# Altium PCB Sampler_DIOT.PCBDOC (part 10 of 11)
Units mm, origin at the board's own origin, x right, y up, seen from the top; angles counter-clockwise.
Board outline 222.9 x 100 mm, 4 copper layers (L1, P2, L3, L4), stack 1.6 mm thick; 754 components, 442 nets, 2347 pads, 1230 vias.
Unrouted connection lines stored in the file: 10.
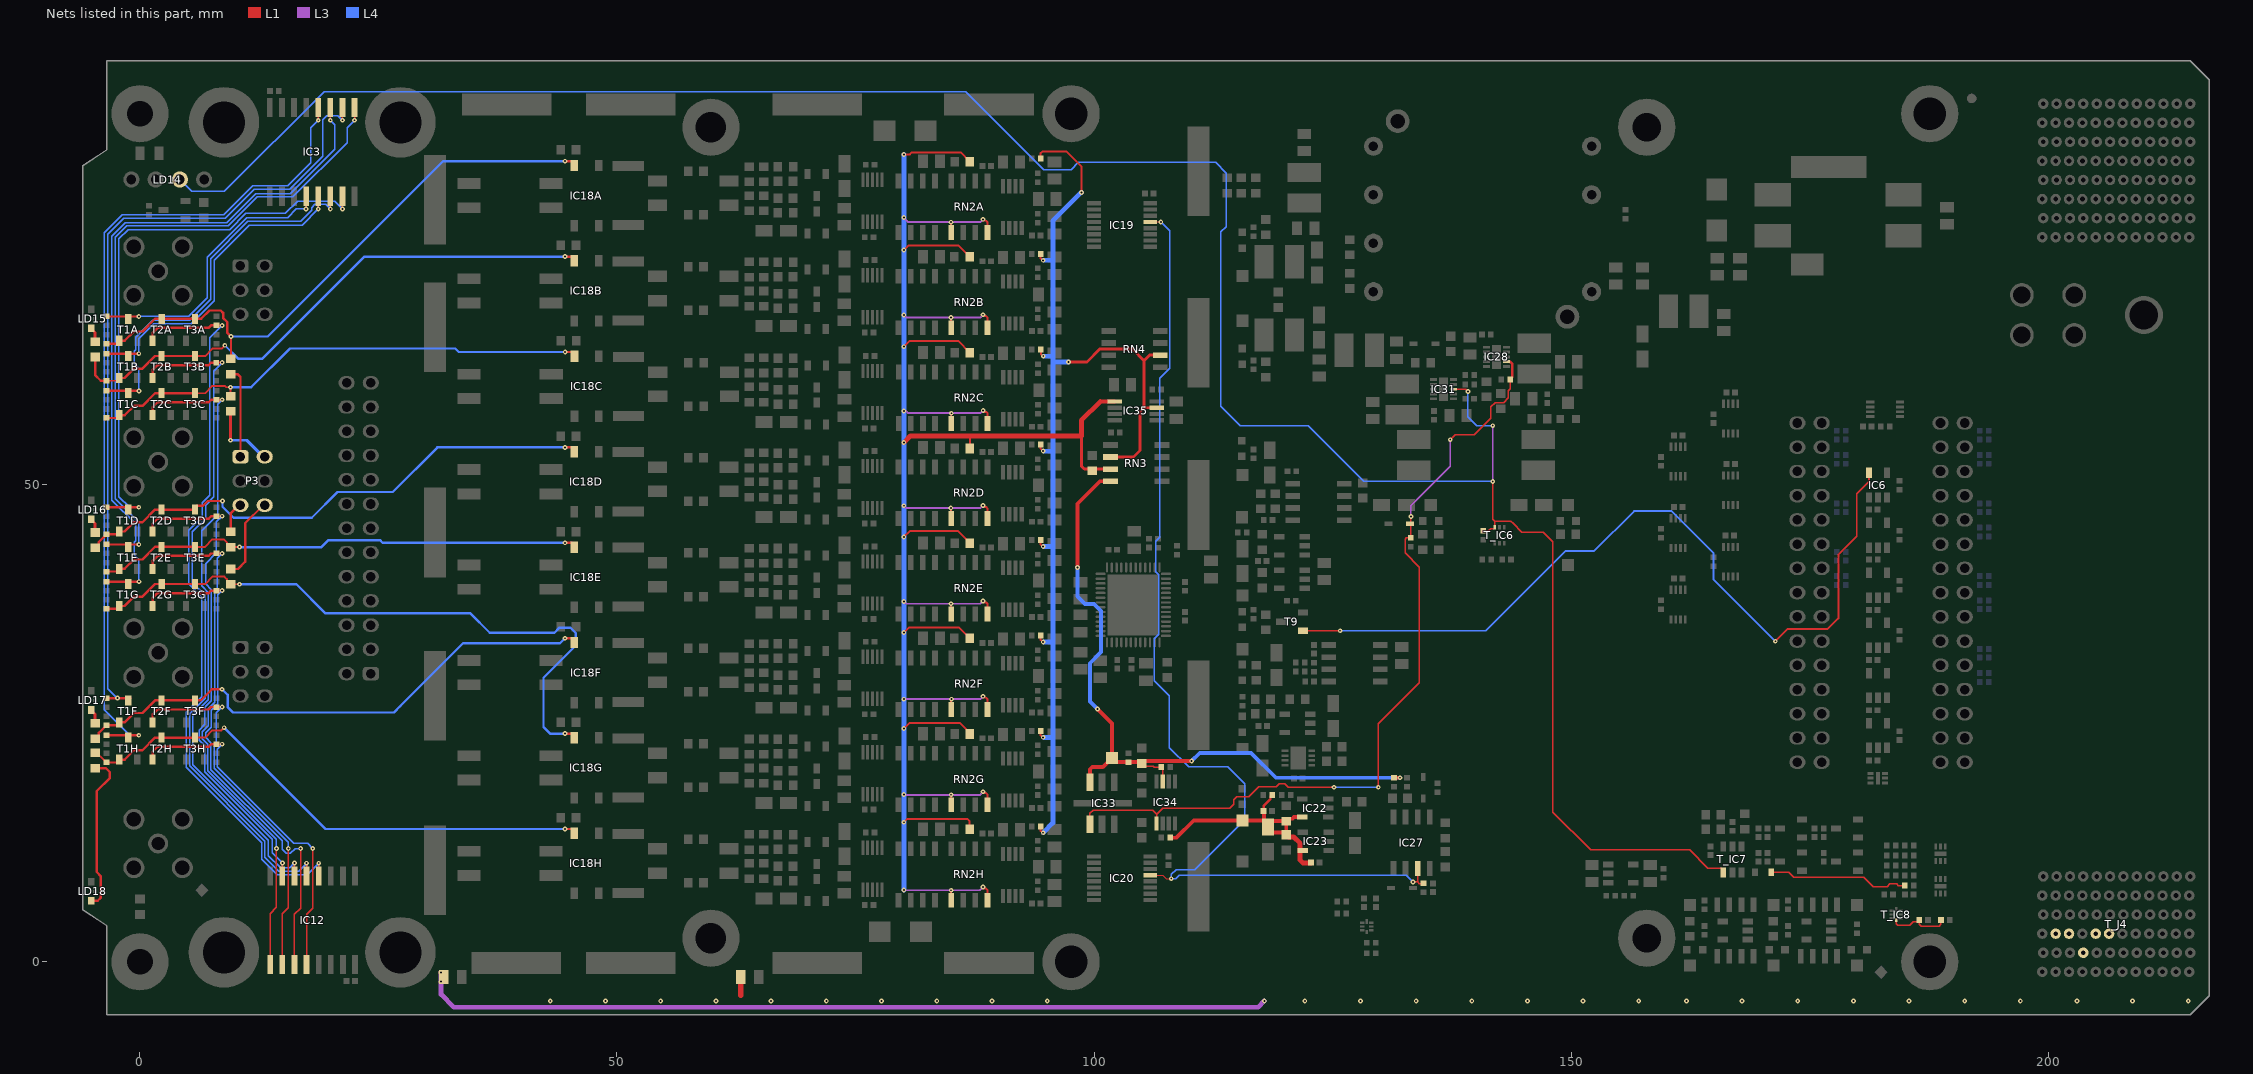
[diagram p11: the nets of this part, all layers, seen from the top]

## Via types
v1: diameter 0.5, hole 0.2, L1 to L4, tented both sides, 1208 vias
v2: diameter 1, hole 0.6, L1 to L4, tented both sides, 16 vias
v3: diameter 0.6, hole 0.3, L1 to L4, tented both sides, 6 vias

## Nets (pads, with @x,y where several pads share a name; then routed paths per layer and width w, separated by ;. In a path a pad name is that pad's centre, name@x,y a point inside that pad or via, vN(x,y) a via of type N, cw(c..) or ccw(c..) an arc to the next point about the centre after c; other vN are vias at no path point) (continued)
PSU_EN: IC31.3 LD14.3 T_IC6.3 T_IC7.1 T_R8.1 | length 250.4
  L1 w0.152: IC31.3@137.691,60.02 138.533,60.02 138.547,60.007 138.955,60.007 v1(139.192,59.77) ; T_R8.1@140.8,45.17 141.348,45.17 141.57,45.392 141.926,45.392 142,45.466 T_IC6.3@142,45.538 142,46.186 ; v1@141.8,50.269 141.8,46.386 142,46.186 ; T_IC7.1@165.969,9.386 165.969,9.574 165.745,9.798 164.346,9.798 162.42,11.723 152.077,11.723 148.1,15.7 148.1,44.025 147.108,45.017 145.375,45.017 145.282,45.017 144.858,45.017 143.925,45.95 143.689,46.186 142,46.186
  L3 w0.152: v1@141.8,50.269 v1(141.8,50.351) v1(141.8,56.2)
  L4 w0.152: LD14.3@4.18,82 5.425,80.755 8.846,80.755 19.314,91.223 86.559,91.223 94.732,83.05 97.625,83.05 98.368,83.793 112.736,83.793 113.851,82.677 113.851,77.07 113.309,76.527 113.309,58.213 115.347,56.175 122.453,56.175 128.277,50.351 v1@141.767,50.351 ; v1(139.192,59.77) 139.192,57.109 140.1,56.2 v1(141.8,56.2)
REF_P1V7066: IC35.1 R7A.1 R7B.1 R7C.1 R7D.1 R7E.1 R7F.1 R7G.1 R7H.1 R83.2 RN2A.5 RN2A.8 RN2B.5 RN2B.8 RN2C.5 RN2C.8 RN2D.5 RN2D.8 RN2E.5 RN2E.8 RN2F.5 RN2F.8 RN2G.5 RN2G.8 RN2H.5 RN2H.8 RN3.3 | length 253.2
  L1 w0.203: v1(80.069,14.631) 80.393,14.955 86.744,14.955 86.969,14.73 R7H.1@86.969,13.88 ; v1(80.069,24.455) 80.669,25.055 85.944,25.055 86.994,24.005 R7G.1@86.994,23.88 ; v1(80.069,34.505) 80.619,35.055 85.819,35.055 R7F.1@86.969,33.905 ; v1(80.069,44.53) 80.694,45.155 85.769,45.155 86.994,43.93 R7E.1@86.994,43.88 ; v1(80.069,64.48) 80.669,65.08 85.769,65.08 R7C.1@86.994,63.855 ; v1(80.069,74.605) 80.569,75.105 85.769,75.105 R7B.1@86.969,73.905 ; v1(80.069,84.63) 80.7,84.63 80.904,84.834 86.04,84.834 R7A.1@86.994,83.88 ; v1(84.994,47.555) 85.024,47.525 RN2D.5@85.024,46.455 ; v1(85.019,37.53) 85.024,37.525 RN2E.5@85.024,36.455 ; v1(85.019,67.53) 85.024,67.525 RN2B.5@85.024,66.455 ; v1(85.019,77.53) 85.024,77.525 RN2A.5@85.024,76.455 ; RN2H.5@85.024,6.455 v1(85.024,7.5) ; RN2G.5@85.024,16.455 v1(85.024,17.51) ; RN2F.5@85.024,26.455 85.024,27.485 v1(85.069,27.53) ; RN2C.5@85.037,56.412 85.037,57.498 v1(85.044,57.505) ; R7D.1@86.994,53.805 86.994,55.054 87.069,55.129 ; v1(88.369,7.83) 88.519,7.68 88.694,7.68 88.834,7.54 RN2H.8@88.834,6.455 ; v1(88.369,17.83) 88.519,17.68 88.694,17.68 88.834,17.54 RN2G.8@88.834,16.455 ; v1(88.369,27.83) 88.519,27.68 88.694,27.68 88.834,27.54 RN2F.8@88.834,26.455 ; v1(88.369,37.83) 88.519,37.68 88.694,37.68 88.834,37.54 RN2E.8@88.834,36.455 ; v1(88.369,47.83) 88.519,47.68 88.694,47.68 88.834,47.54 RN2D.8@88.834,46.455 ; v1(88.369,67.83) 88.519,67.68 88.694,67.68 88.834,67.54 RN2B.8@88.834,66.455 ; v1(88.369,77.83) 88.519,77.68 88.694,77.68 88.834,77.54 RN2A.8@88.834,76.455 ; v1(88.382,57.786) 88.532,57.636 88.707,57.636 88.847,57.496 RN2C.8@88.847,56.412
  L1 w0.3: 98.675,55.129 98.675,51.951 98.986,51.64 99.635,51.64 R83.2@99.8,51.475 99.965,51.64 RN3.3@101.725,51.64
  L1 w0.45: 100.65,58.725 IC35.1@102.175,58.725
  L1 w0.508: v1(80.069,54.43) 80.768,55.129 87.069,55.129 98.675,55.129 98.675,56.75 100.65,58.725
  L3 w0.203: v1(80.069,7.53) 80.099,7.5 v1(85.024,7.5) 88.039,7.5 v1(88.369,7.83) ; v1@80.069,17.506 v1@85.02,17.506 ; v1(80.069,37.782) 80.084,37.782 80.336,37.53 v1(85.019,37.53) 88.069,37.53 v1(88.369,37.83) ; v1(80.069,47.808) 80.084,47.808 80.336,47.555 v1(84.994,47.555) 88.094,47.555 v1(88.369,47.83) ; v1(80.069,67.809) 80.348,67.53 v1(85.019,67.53) 88.069,67.53 v1(88.369,67.83) ; v1(80.069,78.005) 80.544,77.53 v1(85.019,77.53) 88.069,77.53 v1(88.369,77.83) ; v1@80.194,27.53 v1(85.069,27.53) 88.069,27.53 v1(88.369,27.83) ; v1@80.279,57.764 80.538,57.505 v1(85.044,57.505) 88.1,57.505 v1(88.382,57.786) ; v1@85.024,17.48 88.019,17.48 v1(88.369,17.83)
  L4 w0.508: v1(80.069,7.53) v1(80.069,17.531) v1(80.069,37.782) v1(80.069,44.53) v1(80.069,54.43) v1(80.069,67.809) v1(80.069,84.63)
  other v1: 80.069,27.53 80.069,57.733
REF_P2V048: IC35.7 R13A.1 R13B.1 R13C.1 R13D.1 R13E.1 R13F.1 R13G.1 R13H.1 RN3.2 RN4.6 | length 115.3
  L1 w0.203: R13H.1@94.414,14.205 94.414,13.735 94.644,13.505 v1(94.669,13.53) ; R13G.1@94.414,24.205 94.414,23.735 94.644,23.505 v1(94.669,23.53) ; R13F.1@94.414,34.205 94.414,33.735 94.644,33.505 v1(94.669,33.53) ; R13E.1@94.414,44.205 94.414,43.735 94.644,43.505 v1(94.669,43.53) ; R13D.1@94.414,54.205 94.414,53.785 v1(94.669,53.53) ; R13B.1@94.414,74.205 94.414,73.735 94.644,73.505 v1(94.669,73.53) ; R13A.1@94.414,84.205 94.414,84.764 94.573,84.923 97.127,84.923 98.675,83.375 v1(98.675,80.65) ; R13C.1@94.427,64.161 94.427,63.691 94.657,63.461 v1(94.682,63.486)
  L1 w0.3: v1@97.285,62.877 99.252,62.877 100.603,64.228 104.032,64.228 105.255,63.005 ; RN3.2@101.725,52.91 104.134,52.91 104.835,53.611 104.835,57.667 105.255,58.087 105.255,63.005 ; 105.365,58.082 IC35.7@106.568,58.082 ; RN4.6@106.95,63.59 105.84,63.59 105.255,63.005
  L4 w0.5: v1(94.669,13.53) 95.694,14.555 95.694,23.526 ; v1@94.733,23.526 95.694,23.526 ; v1@94.733,33.526 95.694,33.526 ; v1@94.733,43.526 95.694,43.526 ; v1@94.733,53.526 95.694,53.526 ; v1@94.733,73.526 95.694,73.526 ; v1@94.746,63.482 95.694,63.482 ; v1(97.339,62.877) 95.694,62.877 ; v1(98.675,80.65) 95.694,77.669 95.694,73.526 ; 95.694,23.526 95.694,33.526 ; 95.694,33.526 95.694,43.526 ; 95.694,43.526 95.694,53.526 ; 95.694,53.526 95.694,62.877 ; 95.694,62.877 95.694,63.482 ; 95.694,63.482 95.694,73.526
REF_P4V096: C100.2 IC33.7 IC34.7 R59.2 R81.1 R82.2 RN3.4 TP15.1 | length 74.7
  L1 w0.152: C100.2@104.983,20.8 105.292,20.491 106.209,20.491 106.291,20.409 R82.2@107.051,20.409 107.194,20.266 IC34.7@107.194,18.905 IC34.7@107.232,18.943
  L1 w0.35: R59.2@131.425,19.29 v1(132.076,19.29)
  L1 w0.4: v1(98.258,41.34) 98.258,48.008 100.62,50.37 RN3.4@101.725,50.37 ; IC33.7@99.574,18.834 99.574,20.191 99.808,20.425 100.925,20.425 TP15.1@101.875,21.375 ; v1(100.376,26.488) 101.9,24.964 TP15.1@101.9,21.35 ; TP15.1@101.925,21.375 102.37,20.93 R81.1@103.6,20.93 104.853,20.93 C100.2@104.983,20.8 105.229,21.046 110.225,21.046 v1@110.235,21.056
  L4 w0.4: v1(98.258,41.34) 98.258,38.309 99.069,37.498 100.015,37.498 100.739,36.774 100.739,32.464 99.572,31.297 99.572,27.292 v1(100.376,26.488) ; v1(110.235,21.046) 111.076,21.887 116.463,21.887 119.06,19.29 v1(132.076,19.29)
REF_S\H\D\N: D10.1 IC28.7 IC33.1 IC34.1 R69.1 R157.1 | length 88.5
  L1 w0.152: IC33.1@99.574,14.434 99.574,15.549 99.92,15.895 106.179,15.895 106.593,15.48 ; IC34.1@106.593,14.578 106.593,15.48 ; v1(125.15,18.3) 120.344,18.3 119.988,18.656 119.406,18.656 119.1,18.35 117.265,18.35 116.24,17.325 114.975,17.325 114.625,16.975 114.625,16.5 114.225,16.1 107.213,16.1 106.593,15.48 ; v1(129.8,18.3) 129.8,24.956 134.111,29.267 134.111,41.366 132.6,42.877 132.6,44.275 132.75,44.425 133.185,44.425 R157.1@133.2,44.44 133.2,45.84 D10.1@133.14,45.9 ; D10.1@133.215,45.855 v1(133.215,46.665) ; v1(137.341,54.729) 137.361,54.729 137.874,55.242 139.869,55.242 141.594,56.967 141.594,58.16 142.057,58.623 142.931,58.623 143.42,59.111 143.42,59.853 143.611,60.044 R69.1@143.611,61.02
  L1 w0.254: IC28.7@143.242,62.915 143.611,62.915 143.611,62.881 143.674,62.819 143.698,62.819 143.846,62.67 143.846,61.255 R69.1@143.611,61.02
  L3 w0.152: v1(133.215,46.665) 133.215,47.826 137.341,51.951 v1(137.341,54.729)
  L4 w0.152: v1(125.15,18.3) v1(129.8,18.3)
REF_VCC: C41.2 C42.2 C44.1 C45.2 IC22.5 IC23.5 R49.2 R54.2 R80.1 TP8.1 | length 26.1
  L1 w0.25: C45.2@117.775,15.8 117.775,16.35 118.505,17.08 118.505,17.335 R49.2@118.67,17.5
  L1 w0.4: R80.1@107.991,13.013 108.663,13.013 110.448,14.798 TP8.1@115.55,14.798 C44.1@117.821,14.798 ; C45.2@117.775,15.8 117.821,15.754 C44.1@117.821,14.798 ; C44.1@118.65,13.543 C41.2@120.144,13.543 ; C41.2@120.144,13.319 C41.2@120.144,13.543 ; IC22.5@121.844,15.169 121.838,15.175 120.967,15.175 120.791,14.999 120.393,14.999 R54.2@120.144,14.75 ; C44.1@117.821,14.798 117.821,14.536 C44.1@118.225,14.132 118.225,14.325 118.65,14.75 R54.2@120.144,14.75 ; C41.2@120.144,13.543 R54.2@120.144,14.75
  L1 w0.508: C41.2@120.365,13.098 120.911,13.098 121.598,12.411 IC23.5@121.598,11.69 ; IC23.5@121.598,11.648 121.598,10.666 121.896,10.369 C42.2@122.744,10.369
RSTn: T_D6.1 T_R15.1 | length 14.8
  L1 w0.152: T_D6.1@170.976,9.391 172.814,9.391 173.35,8.855 180.695,8.855 181.675,7.875 183.13,7.875 183.423,8.168 184.144,8.168 184.322,7.99 T_R15.1@185.002,7.99
SB_0: T_J4.I2
SB_1: T_J4.G3
SB_2: T_J4.H3
SB_3: T_J4.J3
SB_4: T_J4.K3
SDR_MODE: IC6.5 T9.1 | length 86.2
  L1 w0.203: T9.1@121.9,34.7 v1(125.8,34.7) ; v1(171.419,33.605) 172.679,34.865 176.882,34.865 178.015,35.998 178.015,42.665 179.95,44.6 179.95,49.057 181.227,50.334 IC6.5@181.227,51.27
  L4 w0.203: v1(125.8,34.7) 141.054,34.7 149.396,43.043 152.402,43.043 156.606,47.247 160.544,47.247 164.922,42.869 164.922,40.102 v1(171.419,33.605)
SERVMOD_3V3: T_IC8.5 T_R17.1 T_R19.2 | length 6.5
  L1 w0.152: T_IC8.5@184.091,4.378 184.091,3.994 184.26,3.825 185.517,3.825 185.876,4.183 186.266,4.183 T_R19.2@186.48,4.397 ; T_R19.2@186.48,4.4 T_R19.2@186.48,4.397 ; T_R17.1@188.78,4.4 188.78,3.93 188.575,3.725 186.695,3.725 186.48,3.94 T_R19.2@186.48,4.397
SR_O\E\: IC19.13 IC20.13 IC27.7 R65.1 | length 112.6
  L1 w0.127: IC20.13@105.899,9.087 107.206,9.087 107.576,8.717 v1(108.098,8.717) ; IC19.13@105.899,77.55 v1(107.001,77.55)
  L1 w0.152: v1(133.426,8.379) 133.921,8.379 ; IC27.7@133.921,9.792 133.921,8.379 ; R65.1@134.536,8.212 134.524,8.2 134.1,8.2 133.921,8.379
  L4 w0.152: v1(107.001,77.55) 107.942,76.609 107.942,62.233 106.865,61.156 106.865,44.483 106.475,44.093 106.475,40.875 106.775,40.575 106.775,34.325 106.29,33.84 106.29,29.478 107.9,27.868 107.9,22.44 109.911,20.429 113.993,20.429 115.775,18.647 115.775,14.9 110.55,9.675 108.6,9.675 108.1,9.175 108.1,8.719 v1(108.098,8.717) ; v1@108.101,8.714 108.545,8.714 108.917,9.085 132.72,9.085 v1(133.426,8.379)
STRIP2: T_R27.1 | length 1.9
  L1 w0.6: 62.964,-3.505 T_R27.1@62.964,-1.604
  other v1: 43,-4.1 48.789,-4.1 54.578,-4.1 60.367,-4.1 66.156,-4.1 71.944,-4.1 77.733,-4.1 83.522,-4.1 89.311,-4.1 95.1,-4.1
STRIP3: T_R28.1 | length 89.9
  L1 w0.5: v1(31.562,-2.079) T_R28.1@31.791,-2.079 ; v1(31.562,-1.128) T_R28.1@31.791,-1.128
  L3 w0.5: v1(31.562,-1.128) v1(31.562,-2.079) 31.562,-3.412 32.911,-4.761 117.196,-4.761 v1(117.856,-4.1)
  other v1: 122.1,-4.1 127.933,-4.1 133.767,-4.1 139.6,-4.1 145.433,-4.1 151.267,-4.1 157.1,-4.1 162.1,-4.1 167.933,-4.1 173.767,-4.1 179.6,-4.1 185.433,-4.1 191.267,-4.1 197.1,-4.1 203.033,-4.1 208.867,-4.1 214.7,-4.1
TERM_EN0: IC12.4 R33A.2 T2A.1 | length 78.9
  L1 w0.152: IC12.4@18.735,9 v1@18.735,10.331
  L1 w0.203: R33A.2@8,66.705 8.606,66.705 v1(8.613,66.712)
  L1 w0.25: T2A.1@1.317,65.1 1.317,65.925 1.842,66.45 7.197,66.45 7.452,66.705 R33A.2@7.997,66.705
  L4 w0.152: v1(8.613,66.712) 7.322,65.421 7.322,48.91 6.505,48.093 6.505,46.614 5.117,45.226 5.117,39.609 6.49,38.236 6.49,27.768 4.858,26.136 4.858,20.371 12.747,12.482 12.747,10.757 14.392,9.112 17.509,9.112 v1(18.735,10.338)
TERM_EN1: IC12.5 R33B.2 T2B.1 | length 72.8
  L1 w0.152: IC12.5@17.465,9 v1@17.465,10.331
  L1 w0.203: R33B.2@8,62.805 8.606,62.805 v1(8.613,62.812)
  L1 w0.25: T2B.1@1.32,61.2 1.32,62.025 1.845,62.55 7.199,62.55 7.454,62.805 R33B.2@7.997,62.805 R33B.2@8,62.805
  L4 w0.152: v1@8.61,62.809 7.713,61.911 7.713,48.726 6.869,47.882 6.869,46.463 5.481,45.076 5.481,39.759 6.823,38.417 6.823,27.63 5.191,25.999 5.191,20.536 13.09,12.637 13.09,10.961 14.558,9.492 16.619,9.492 v1(17.465,10.338)
TERM_EN2: IC12.6 R33C.2 T2C.1 | length 66.2
  L1 w0.152: IC12.6@16.195,9.033 v1@16.195,10.364
  L1 w0.203: R33C.2@8,58.905 8.606,58.905 v1(8.613,58.912)
  L1 w0.25: T2C.1@1.325,57.3 1.325,58.125 1.85,58.65 7.205,58.65 7.46,58.905 R33C.2@8,58.905
  L4 w0.152: v1(8.613,58.912) 8.126,58.425 8.126,46.859 6.466,45.199 6.466,39.409 7.166,38.709 7.166,27.488 5.534,25.856 5.534,20.664 13.447,12.751 13.447,11.139 14.731,9.855 15.679,9.855 v1(16.195,10.371)
TERM_EN3: IC12.7 R33D.2 T2D.1 | length 51.2
  L1 w0.152: IC12.7@14.925,9.033 v1@14.925,10.364
  L1 w0.203: R33D.2@8,46.705 8.606,46.705 v1(8.613,46.712)
  L1 w0.25: T2D.1@1.317,45.1 1.317,45.925 1.842,46.45 7.197,46.45 7.452,46.705 R33D.2@7.997,46.705
  L4 w0.152: v1(8.613,46.712) 8.005,46.104 8.005,42.855 6.875,41.725 6.875,39.625 7.485,39.015 7.485,27.356 6.801,26.672 6.801,24.875 6.205,24.279 6.205,23.247 6.77,22.682 6.77,19.909 13.839,12.84 13.839,11.457 v1(14.925,10.371)
TERM_EN4: IC12.9 R33E.2 T2E.1 | length 55.6
  L1 w0.152: IC12.9@13.655,-0.3 13.655,5.055 14.301,5.701 14.301,11.625
  L1 w0.203: R33E.2@8,42.805 8.606,42.805 v1(8.613,42.812)
  L1 w0.25: T2E.1@1.32,41.2 1.32,42.025 1.845,42.55 7.199,42.55 7.454,42.805 R33E.2@8,42.805
  L4 w0.152: v1@8.61,42.809 8.086,42.284 8.086,38.937 7.828,38.68 7.828,27.214 7.144,26.53 7.144,24.733 6.548,24.137 6.548,23.39 7.114,22.825 7.114,20.016 14.301,12.828 v1(14.301,11.875)
TERM_EN5: IC12.10 R33F.2 T2F.1 | length 39
  L1 w0.152: IC12.10@14.925,-0.3 14.925,5.028 15.55,5.653 15.55,11.625
  L1 w0.203: R33F.2@8.003,26.705 8.609,26.705 v1(8.616,26.712)
  L1 w0.25: T2F.1@1.317,25.1 1.317,25.925 1.842,26.45 7.197,26.45 7.452,26.705 R33F.2@7.997,26.705
  L4 w0.152: v1@8.613,26.712 8,26.099 8,22.907 7.773,22.68 7.773,20.289 15.55,12.512 v1(15.55,11.875)
TERM_EN6: IC12.11 R33G.2 T2G.1 | length 54.1
  L1 w0.152: IC12.11@16.195,-0.3 16.195,4.983 16.841,5.628 16.841,11.625
  L1 w0.203: R33G.2@8,38.905 8.606,38.905 v1(8.613,38.912)
  L1 w0.25: T2G.1@1.325,37.3 1.325,38.125 1.85,38.65 7.205,38.65 7.46,38.905 R33G.2@8,38.905
  L4 w0.152: v1(8.613,38.912) 8.151,38.45 8.151,27.07 7.474,26.393 7.474,24.597 6.878,24.001 6.878,23.526 7.443,22.961 7.443,20.153 14.925,12.671 14.925,11.775 15.331,11.369 15.773,11.369 16.279,11.875 v1(16.841,11.875)
TERM_EN7: IC12.12 R33H.2 T2H.1 | length 36.8
  L1 w0.152: IC12.12@17.465,-0.3 17.465,4.983 18.111,5.628 18.111,11.625
  L1 w0.203: R33H.2@8,22.805 8.606,22.805 v1(8.613,22.812)
  L1 w0.25: T2H.1@1.32,21.2 1.32,22.025 1.845,22.55 7.199,22.55 7.454,22.805 R33H.2@8,22.805
  L4 w0.152: v1@8.61,22.809 8.104,22.303 8.104,20.426 16.106,12.425 17.561,12.425 v1(18.111,11.875)
TERM_IND0: IC3.4 R27A.1 T1A.3 | length 29.6
  L1 w0.152: v1@17.415,78.919 IC3.4@17.415,80.25
  L1 w0.25: R27A.1@-3.5,67.645 -1.478,67.645 -1.233,67.4 -1.233,67.425 T1A.3@-1.033,67.625 ; T1A.3@-1.033,67.645 v1@-0.129,67.645
  L4 w0.152: v1(-0.122,67.645) 5.095,67.645 7.069,69.619 7.069,73.865 11.191,77.986 15.475,77.986 16.4,78.912 v1(17.415,78.912)
TERM_IND1: IC3.5 R27B.1 T1B.3 | length 33.4
  L1 w0.152: v1@18.685,78.919 IC3.5@18.685,80.25
  L1 w0.25: R27B.1@-3.497,63.745 -1.475,63.745 -1.23,63.5 -1.23,63.525 T1B.3@-1.03,63.725 ; T1B.3@-1.03,63.745 v1@-0.126,63.745
  L4 w0.152: v1(-0.119,63.745) -0.119,65.31 1.451,66.88 5.364,66.88 7.8,69.317 7.8,73.562 11.465,77.227 17,77.227 v1(18.685,78.912)
TERM_IND2: IC3.6 R27C.1 T1C.3 | length 39.8
  L1 w0.152: v1@19.955,78.919 IC3.6@19.955,80.25
  L1 w0.25: R27C.1@-3.492,59.845 -1.47,59.845 -1.225,59.6 -1.225,59.625 T1C.3@-1.025,59.825 ; T1C.3@-1.025,59.845 v1@-0.121,59.845
  L4 w0.152: v1(-0.114,59.845) -0.114,62.215 -0.613,62.715 -0.613,63.985 -0.452,64.147 -0.452,65.448 1.362,67.262 5.206,67.262 7.418,69.475 7.418,73.72 11.307,77.609 16.835,77.609 17.984,78.757 17.984,79.06 18.321,79.397 19.469,79.397 v1(19.955,78.912)
TERM_IND3: IC3.7 R27D.1 T1D.3 | length 59.9
  L1 w0.152: v1@21.225,78.919 IC3.7@21.225,80.25
  L1 w0.25: R27D.1@-3.5,47.645 -1.478,47.645 T1D.3@-1.233,47.4 -1.233,47.425 T1D.3@-1.033,47.625 ; T1D.3@-1.033,47.645 v1@-0.129,47.645
  L4 w0.152: v1(-0.122,47.645) -1.095,47.645 -2.206,48.756 -2.206,75.769 -1.222,76.753 9.414,76.753 11.104,78.442 15.242,78.442 16.527,79.727 20.409,79.727 v1(21.225,78.912)
TERM_IND4: IC3.9 R27E.1 T1E.3 | length 69.2
  L1 w0.152: v1@22.495,88.219 IC3.9@22.495,89.55
  L1 w0.25: R27E.1@-3.497,43.745 -1.475,43.745 T1E.3@-1.23,43.5 -1.23,43.525 T1E.3@-1.03,43.725 ; T1E.3@-1.03,43.745 v1@-0.126,43.745
  L4 w0.152: v1(-0.119,43.745) -0.119,46.061 -2.588,48.53 -2.588,75.927 -1.38,77.134 9.256,77.134 12.297,80.175 16.035,80.175 21.7,85.84 21.7,87.417 v1(22.495,88.212)
TERM_IND5: IC3.10 R27F.1 T1F.3 | length 85.2
  L1 w0.152: v1@21.225,88.219 IC3.10@21.225,89.55
  L1 w0.25: R27F.1@-3.5,27.645 v1(-2.344,27.645) -1.478,27.645 T1F.3@-1.233,27.4 -1.233,27.425 T1F.3@-1.033,27.625
  L4 w0.152: v1@-2.406,27.645 -3.384,28.623 -3.384,76.257 -1.71,77.931 8.926,77.931 11.967,80.971 15.681,80.971 19.15,84.44 19.15,88.282 19.568,88.7 20.737,88.7 v1(21.225,88.212)
TERM_IND6: IC3.11 R27G.1 T1G.3 | length 72.8
  L1 w0.152: v1@19.955,88.219 IC3.11@19.955,89.55
  L1 w0.25: R27G.1@-3.492,39.845 -1.47,39.845 T1G.3@-1.225,39.6 -1.225,39.625 T1G.3@-1.025,39.825 ; T1G.3@-1.025,39.845 v1@-0.121,39.845
  L4 w0.152: v1(-0.114,39.845) -0.114,42.165 -0.61,42.661 -0.61,43.989 -0.452,44.147 -0.452,45.901 -2.936,48.385 -2.936,76.072 -1.525,77.483 9.112,77.483 12.152,80.524 15.759,80.524 20.425,85.19 20.425,87.742 v1(19.955,88.212)
TERM_IND7: IC3.12 R27H.1 T1H.3 | length 89.1
  L1 w0.152: v1@18.685,88.219 IC3.12@18.685,89.55
  L1 w0.25: R27H.1@-3.497,23.745 -1.475,23.745 T1H.3@-1.23,23.5 -1.23,23.525 T1H.3@-1.03,23.725 ; T1H.3@-1.03,23.745 v1@-0.126,23.745
  L4 w0.152: v1(-0.119,23.745) -1.093,23.745 -3.766,26.418 -3.766,76.415 -1.868,78.313 8.768,78.313 11.809,81.353 15.471,81.353 17.9,83.782 17.9,87.427 v1(18.685,88.212)
TERM_LEDn0: IC18A.3 R26.2 R29A.1 T1A.1 T2A.3 T3A.3 | length 62.9
  L1 w0.25: R29A.1@-3.52,64.805 R29A.1@-3.5,64.805 -2.383,64.805 -2.333,64.855 -2.333,64.95 -2.183,65.1 T1A.1@-2.175,65.1 -1.608,65.1 -0.633,66.075 0.25,66.075 1.575,67.4 T2A.3@2.275,67.4 T3A.3@5.775,67.4 5.783,67.408 6.412,67.408 7.281,68.276 8.457,68.276 8.716,68.018 8.716,67.48 9.157,67.039 9.157,65.93 v1(9.538,65.549) ; R26.2@9.538,63.2 v1@9.538,65.524 ; v1(44.553,83.92) 45.255,83.92 45.53,83.645 IC18A.3@45.53,83.47
  L4 w0.25: v1(9.538,65.549) 13.399,65.549 31.77,83.92 v1(44.553,83.92)
TERM_LEDn1: IC18B.3 R28.2 R29B.1 T1B.1 T2B.3 T3B.3 | length 59.3
  L1 w0.2: R29B.1@-3.5,60.905 -2.405,60.905 -2.18,61.13 T1B.1@-2.18,61.2 ; T3B.3@5.77,63.5 6.822,63.5 7.594,64.272 8.545,64.272 v1(8.893,64.62)
  L1 w0.25: R28.2@-4.7,63.4 -4.7,61.5 -4.105,60.905 R29B.1@-3.5,60.905 ; T1B.1@-2.175,61.2 -1.608,61.2 -0.633,62.175 0.25,62.175 1.575,63.5 T2B.3@2.275,63.5 ; T2B.3@2.267,63.5 T3B.3@5.767,63.5 T3B.3@5.77,63.5 ; v1(44.553,73.92) 45.255,73.92 45.53,73.645 IC18B.3@45.53,73.47
  L4 w0.25: v1(8.893,64.62) 10.313,63.2 12.8,63.2 23.52,73.92 v1(44.553,73.92)
TERM_LEDn2: IC18C.3 R29C.1 R30.2 T1C.1 T2C.3 T3C.3 | length 53.5
  L1 w0.2: T3C.3@5.767,59.6 6.819,59.6 7.591,60.372 8.888,60.372 9.035,60.225 v1(9.5,60.225) R30.2@9.5,59.6
  L1 w0.25: R29C.1@-3.627,56.878 R29C.1@-3.5,57.005 -2.375,57.005 -2.325,57.055 -2.325,57.15 T1C.1@-2.175,57.3 ; T1C.1@-2.172,57.3 -1.605,57.3 -0.63,58.275 0.253,58.275 1.578,59.6 T3C.3@5.767,59.6 ; v1(44.565,63.92) 45.267,63.92 45.542,63.645 IC18C.3@45.542,63.47
  L4 w0.25: v1(9.5,60.225) 11.65,60.225 15.712,64.287 33.042,64.287 33.409,63.92 v1(44.565,63.92)
TERM_LEDn3: IC18D.3 R29D.1 R32.2 T1D.1 T2D.3 T3D.3 | length 57
  L1 w0.25: R32.2@-4.7,43.4 -4.65,43.4 -4.325,43.725 -4.325,44 -3.52,44.805 R29D.1@-3.5,44.805 -2.383,44.805 -2.333,44.855 -2.333,44.95 T1D.1@-2.183,45.1 ; T1D.1@-2.175,45.1 -1.608,45.1 -0.633,46.075 0.25,46.075 1.575,47.4 T2D.3@2.275,47.4 ; T2D.3@2.267,47.4 T3D.3@5.767,47.4 5.767,47.6 5.967,47.8 6.6,47.8 7.1,48.3 v1(8.65,48.3) ; v1(44.553,53.92) 45.255,53.92 45.53,53.645 IC18D.3@45.53,53.47
  L4 w0.25: v1(8.65,48.3) 8.65,47.7 9.8,46.55 18,46.55 20.699,49.249 21.077,49.249 26.499,49.249 31.17,53.92 v1(44.553,53.92)
TERM_LEDn4: IC18E.3 R29E.1 R34.2 T1E.1 T2E.3 T3E.3 | length 51.6
  L1 w0.2: R29E.1@-3.5,40.905 -2.405,40.905 -2.18,41.13 T1E.1@-2.18,41.2 ; T3E.3@5.77,43.5 6.822,43.5 7.594,44.272 8.804,44.272 9.1,43.976 9.1,43.822 9.45,43.472 v1(10.425,43.472)
  L1 w0.25: T1E.1@-2.175,41.2 -1.608,41.2 -0.633,42.175 0.25,42.175 1.575,43.5 T2E.3@2.275,43.5 ; T2E.3@2.27,43.5 T3E.3@5.77,43.5 ; v1(44.553,43.92) 45.255,43.92 45.53,43.645 IC18E.3@45.53,43.47
  L4 w0.25: v1(10.425,43.472) 19.022,43.472 19.725,44.175 22.025,44.175 22.05,44.2 25.15,44.2 25.43,43.92 v1(44.553,43.92) v1@44.572,43.92
TERM_LEDn5: IC18F.3 R29F.1 R37.2 T1F.1 T2F.3 T3F.3 | length 57.9
  L1 w0.25: R37.2@-4.7,23.4 -4.65,23.4 -4.325,23.725 -4.325,24 -3.52,24.805 R29F.1@-3.5,24.805 -2.383,24.805 -2.333,24.855 -2.333,24.95 T1F.1@-2.183,25.1 ; T1F.1@-2.175,25.1 -1.608,25.1 -0.633,26.075 0.25,26.075 1.575,27.4 T2F.3@2.275,27.4 ; T2F.3@2.267,27.4 T3F.3@5.767,27.4 6.366,27.4 7.533,28.567 v1(8.607,28.567) ; v1(44.553,33.92) 45.255,33.92 45.53,33.645 IC18F.3@45.53,33.47
  L4 w0.25: v1(8.607,28.567) 9.185,27.99 9.185,26.712 9.758,26.139 26.614,26.139 27.266,26.791 33.864,33.389 44.023,33.389 v1(44.553,33.92)
TERM_LEDn6: IC18G.3 R29G.1 R38.2 T1G.1 T2G.3 T3G.3 | length 68.9
  L1 w0.2: T3G.3@5.77,39.6 T3G.3@5.775,39.6 6.822,39.6 7.594,40.372 8.847,40.372 9.1,40.119 9.1,39.922 9.45,39.572 v1(10.425,39.572)
  L1 w0.25: R29G.1@-3.627,36.878 R29G.1@-3.5,37.005 -2.375,37.005 -2.325,37.055 -2.325,37.15 T1G.1@-2.175,37.3 -1.608,37.3 -0.633,38.275 0.25,38.275 1.575,39.6 T2G.3@2.275,39.6 T3G.3@5.77,39.6 ; v1(44.553,23.92) 45.255,23.92 45.53,23.645 IC18G.3@45.53,23.47
  L4 w0.25: v1(10.425,39.572) 16.403,39.572 19.45,36.525 34.63,36.525 36.654,34.501 43.434,34.501 43.968,35.035 45.102,35.035 45.669,34.468 45.669,33.15 42.29,29.771 42.29,24.61 42.98,23.92 v1(44.553,23.92)
TERM_LEDn7: IC18H.3 R29H.1 R40.2 T1H.1 T2H.3 T3H.3 | length 56.9
  L1 w0.2: R40.2@-4.7,21.9 -4.35,21.55 -4.165,21.55 -3.52,20.905 R29H.1@-3.5,20.905 -2.405,20.905 -2.18,21.13 T1H.1@-2.18,21.2 ; T3H.3@5.767,23.5 6.819,23.5 7.581,24.262 8.538,24.262 v1(8.821,24.546)
  L1 w0.25: T1H.1@-2.172,21.2 -1.605,21.2 -0.63,22.175 0.253,22.175 1.578,23.5 T2H.3@2.278,23.5 ; T2H.3@2.27,23.5 T3H.3@5.77,23.5 ; v1(44.553,13.92) 45.255,13.92 45.53,13.645 IC18H.3@45.53,13.47
  L4 w0.25: v1(8.821,24.546) 19.447,13.92 25.1,13.92 v1(44.553,13.92)
TS0: P3.1 R26.1 | length 9.6
  L1 w0.25: R26.1@9.5,61.6 10.229,61.6 10.53,61.299 P3.1@10.53,52.94
  L1 w0.3: P3.1@10.451,52.94 P3.1@10.53,52.94
TS1: LD15.1 R28.1 | length 1.6
  L1 w0.3: LD15.1@-5.1,66.4 -5.1,66.35 -4.7,65.95 R28.1@-4.7,65
TS2: P3.2 R30.1 | length 7.6
  L1 w0.3: v1(9.5,54.675) R30.1@9.5,57.7 R30.1@9.5,58
  L4 w0.3: v1(9.5,54.675) 11.185,54.675 12.92,52.94 P3.2@13.07,52.94
TS3: LD16.1 R32.1 | length 1.6
  L1 w0.3: LD16.1@-5.1,46.4 -5.1,46.35 -4.7,45.95 R32.1@-4.7,45
TS4: P3.5 R34.1 | length 3.3
  L1 w0.25: R34.1@9.5,45.072 9.5,46.98 10.38,47.86 P3.5@10.53,47.86
TS5: LD17.1 R37.1 | length 1.6
  L1 w0.3: LD17.1@-5.1,26.4 -5.1,26.35 -4.7,25.95 R37.1@-4.7,25
TS6: P3.6 R38.1 | length 8.7
  L1 w0.25: R38.1@9.5,41.172 10.257,41.172 11.023,41.938 11.023,45.963 12.92,47.86 P3.6@13.07,47.86
TS7: LD18.1 R40.1 | length 16.7
  L1 w0.25: LD18.1@-5.1,6.4 -4.425,6.4 -4.125,6.7 -4.125,9 -4.536,9.411 -4.536,17.892 -3.158,19.269 -3.158,19.865 -3.593,20.3 R40.1@-4.7,20.3
pads on no net: FTG1.FTG2 FTG2.1 FTG3.1 FTG4.FTG2 FTG5.1 FTG6.1 IC3.13 IC12.13 IC25.9 IC28.4 IC31.4 LD15.3 LD16.3 LD17.3 LD18.3 M1.MH M2.MH T_D1.5 T_D2.5 T_D3.5 T_IC1.4 T_IC2.5 T_IC3.7 T_IC4.5 T_IC5.7 T_J4.B1 T_J4.L2 T_J5.A3 T_J5.A5 T_J5.A7 T_J5.A8 T_J5.B2 T_J5.B3 T_J5.B4 T_J5.B5 T_J5.B6 T_J5.B7 T_J5.B8 T_J5.C2 T_J5.C4 T_J5.C6 T_J5.C8 T_J5.D3 T_J5.D5 T_J5.D7 T_J5.D8 T_J5.E2 T_J5.E3 T_J5.E4 T_J5.E5 T_J5.E6 T_J5.E7 T_J5.E8 T_J5.F2 T_J5.F4 T_J5.F6 T_J5.F8 T_J5.G3 T_J5.G5 T_J5.G7 T_J5.H2 T_J5.H3 T_J5.H4 T_J5.H5 T_J5.H6 T_J5.H7 T_J5.H8 T_J5.I2 T_J5.I4 T_J5.I6 T_J5.I8 T_J5.J3 T_J5.J5 T_J5.J7 T_J5.K2 T_J5.K3 T_J5.K4 T_J5.K5 T_J5.K6 T_J5.K7 T_J5.K8 T_J5.L2 T_J5.L4 T_J5.L6 T_J5.L8 T_J6.5

## Polygon pours and split planes (outlines as drawn)
P3V3A on L1 "P3V3A_L01_P176" (solid, remove dead copper, pour order 176): 137.571,52.529 141.273,52.529 141.273,50.529 140.354,50.529 139.399,49.574 139.399,41.277 137.1,38.978 137.1,19.025 136.497,18.422 134.5,18.422 134.281,18.641 134.281,20.419 134.25,20.45 135.1,21.3 135.1,39.825 137.55,42.275 137.55,52.55
no net on L1 "Balancing_L1" (solid, pour order 192): -6,5.45 -6,83.45 -3.5,85.1 -3.5,94.45 214.9,94.45 216.9,92.45 216.9,-3.55 214.9,-5.55 -3.5,-5.55 -3.5,3.8
P3V3 on L1 "P3V3_L01_P189" (solid, remove dead copper, pour order 189): 17.9,1.216 17.9,4.25 19.705,6.055 19.705,10 19.715,10.01 22.845,10.01 22.845,3.945 22.845,-1.3 22.245,-1.3 22.245,1.155 21.375,2.025 20.325,2.025 19.325,1.025 18.091,1.025
P3V3A on L1 "P3V3A_L01_P177" (solid, remove dead copper, pour order 177): 145.546,50.529 138.077,50.529 138.077,52.529 148.321,52.529 150.325,52.525 150.335,52.515 150.335,47.245 149.065,47.245 149.055,47.255 146.362,47.255 146.25,47.367 146.25,49.825
P12V0 on L1 "P12V0_L01_P186" (solid, remove dead copper, pour order 186): 190.42,19.595 188.273,19.595 187.675,20.193 187.675,21.7 190.829,24.854 191.795,24.854 192.416,25.475 192.416,38.473 193.55,39.607 193.55,57.8 183.9,67.45 164.801,67.45 164.4,67.049 164.4,63.825 154.138,53.563 153.404,53.563 152.884,54.084 162.4,63.6 162.4,69.95 168.3,69.95 168.975,70.625 168.975,72.955 168.73,73.2 164.325,73.2 164.225,73.3 164.225,77.8 167.6,77.8 168.05,77.35 173.05,77.35 173.05,70.9 173.825,70.125 185.875,70.125 195.575,60.425 195.575,24.15 192.825,21.4 192.825,21.22
P2V5A on L1 "P2V5A_L01_P161" (solid, remove dead copper, pour order 161): 117.15,43.65 117.15,41.842 116.908,41.6 114.275,41.6 113.85,41.175 113.85,40.975 113.655,40.78 111.527,40.78 111.527,37.552 111.525,37.55 116.1,37.55 116.39,37.26 116.39,36.682 116.928,36.682 117.01,36.6 117.15,36.6 117.25,36.5 117.25,36 117.3,35.95 118.8,35.95 119.025,36.175 120.146,36.175 121.046,35.275 125.875,35.275 126.175,35.575 126.175,37.625 125.775,38.025 122.6,38.025 121.875,37.3 120.675,37.3 120.56,37.415 120.56,38.385 120.427,38.518 120.082,38.518 119.95,38.65 119.95,43.075 119.375,43.65 118.15,43.65
N12V0A on L1 "N12V0A_L01_P162" (solid, remove dead copper, pour order 162): 121.272,19.51 119.415,19.51 118.95,19.975 118.95,21.275 119.16,21.485 120.362,21.485 120.362,23.3 120.537,23.475 120.537,24.322 119.195,24.322 118.975,24.542 118.975,25 118.65,25.325 117.55,25.325 117.35,25.525 117.35,26.525 116.45,26.525 116.45,24.825 116.1,24.475 114.5,24.475 113.15,23.125 113.15,20.925 111.475,19.25 111.475,16.5 111.65,16.325 112.718,16.325 113.15,16.757 113.15,17.348 116.825,21.023 116.825,21.55 116.93,21.655 118.37,21.655 118.475,21.55 118.475,19.596 119.181,18.89 121.272,18.89
P5V0A on L1 "P5V0A_L01_P163" (solid, remove dead copper, pour order 163): 125.371,33.499 112.424,33.499 111.65,32.725 109.45,32.725 108.769,32.044 108.769,29.78 109.519,29.78 109.519,31.594 109.8,31.875 116.175,31.875 116.5,31.55 116.5,30.65 117.5,30.65 117.5,31.225 117.775,31.5 120.1,31.5 120.4,31.2 120.4,29.364 120.685,29.079 122.456,29.079 122.456,29.699 121.051,29.699 120.725,30.025 120.725,30.909 120.87,31.054 121.45,31.054 121.45,32.325 122.015,32.89 125.362,32.89 125.371,32.899
P12V0A on L1 "P12V0A_L01_P164" (solid, remove dead copper, pour order 164): 118.103,46.168 117.993,46.278 117.993,47.919 117.131,47.919 116.75,48.3 116.75,49.525 117.033,49.808 121.609,49.808 121.609,50.701 121.46,50.85 120.825,50.85 120.61,51.065 120.61,51.815 120.5,51.925 117.25,51.925 117.01,52.165 117.01,53.05 116.39,53.05 116.39,52.165 116.15,51.925 114.925,51.925 114.7,52.15 114.7,55.575 114.375,55.9 113.125,55.9 112.75,55.525 112.75,50.025 113.925,48.85 115.775,48.85 116.35,48.275 116.35,46.55 116.912,45.988 118.103,45.988
P5V0A on L1 "P5V0A_L01_P165" (solid, remove dead copper, pour order 165): 105.239,41.238 105.239,43.692 105.042,43.889 105.042,45.922 104.69,46.275 103.55,46.275 101.81,44.535 101.81,42.887 101.349,42.887 101.061,42.599 100.82,42.599 100.82,44.97 103.025,47.175 106.325,47.175 107.65,45.85 107.65,44.239 107.482,44.071 105.482,44.071 105.448,44.037 105.448,43.869 105.564,43.753 105.569,43.757 106.068,43.757 106.068,43.137 105.489,42.558 105.489,41.214
P3V3A on L1 "P3V3A_L01_P166" (solid, remove dead copper, pour order 166): 121.55,42.925 121.55,38.7 121.825,38.425 125.775,38.425 126.175,38.825 126.175,40.15 125.8,40.525 123.45,40.525 123.3,40.675 123.3,42.58 122.955,42.925
N13V0 on L1 "N13V0_L01_P167" (solid, remove dead copper, pour order 167): 123.903,20.51 123.903,21.319 123.732,21.489 122.237,21.489 121.176,22.55 120.587,22.55 120.587,23.137 120.9,23.45 123.593,23.45 123.925,23.782 123.925,24.375 123.578,24.722 122.137,24.722 122.137,25.272 123.412,25.272 123.5,25.36 125.985,25.36 126.375,25.75 126.375,41.225 127.325,41.225 127.325,24.262 126.623,23.56 125.16,23.56 124.853,23.253 124.853,20.51
P6V0A on L1 "P6V0A_L01_P178" (solid, remove dead copper, pour order 178): 131.55,32.475 131.55,33.752 131.28,34.022 131.28,52.524 131.275,52.529 135.975,52.529 135.935,52.489 135.935,47.245 133.12,47.245 132.6,46.725 132.6,42.425 133.719,41.306 133.719,29.944 131.91,28.135 129.392,28.135 129.221,28.306 129.221,29.689 132.746,29.689 133.215,30.157 133.215,32.393 133.13,32.478 133.127,32.475 132.827,32.475
P3V3 on L1 "P3V3_L01_P188" (solid, remove dead copper, pour order 188): 160.525,31.875 162.94,31.875 163.575,32.51 163.575,33.725 163.05,34.25 159.151,34.25 157.7,35.701 157.7,39.475 158.085,39.86 161.087,39.86 161.087,40.937 164.54,44.39 166.488,44.39 166.488,45.01 164.235,45.01 161.55,42.325 158.15,42.325 157.7,42.775 157.7,46.725 158.334,47.359 161.087,47.359 161.087,48.387 164.559,51.859 166.588,51.859 166.588,52.479 164.113,52.479 161.409,49.775 158.225,49.775 157.675,50.325 157.675,53.325 159.209,54.859 161.088,54.859 161.088,55.863 164.584,59.359 166.588,59.359 166.588,59.979 166.738,60.129 175.921,60.129 178.825,57.225 178.825,56.367 179.402,55.79 180.91,55.79 180.91,56.41 179.915,56.41 179.575,56.75 179.575,57.525 176.283,60.817 163.742,60.817 155.51,52.585 152.927,52.585 152.167,53.345 151.354,52.532 151.332,52.532 151.332,50.147 154.575,46.903 154.575,34.9 157.6,31.875
STRIP2 on L1 "STRIP2_L01_P158" (solid, pour order 158): 96.5,-5.55 96.5,-3.15 41.5,-3.15 41.5,-5.55
STRIP3 on L1 "STRIP3_L01_P157" (solid, pour order 157): 214.145,-5.55 216.545,-3.15 116.5,-3.15 116.5,-5.55
CHASSIS on L1 "CHASSIS_L01_P156" (solid, remove dead copper, pour order 156): 3,1.7 ccw(c1,1.7) 1,3.7 -3.5,3.7 -3.5,-5.55 36.5,-5.55 36.5,-3.15 3,-3.15
GND on L1 "GND_L01_P187" (solid, remove dead copper, pour order 187): 180.95,81.525 178.575,79.15 167.833,79.15 167.183,79.8 163.687,79.8 163.35,80.137 163.35,82.35 166.725,85.725 180.275,85.725 180.95,85.05
P3V3 on L1 "P3V3_L01_P171" (solid, remove dead copper, pour order 171): 130.263,1.143 131.282,1.143 131.875,0.55 131.875,-0.45 130.8,-1.525 125.675,-1.525 125.075,-0.925 125.075,0.225 125.3,0.45 129.825,0.45 130,0.625 130,0.975 130.168,1.143
P3V3_MP on L1 "P3V3_MP_L01_P169" (solid, remove dead copper, pour order 169): 190.428,21.026 190.428,21.453 190.595,21.62 192.48,21.62 192.925,21.175 192.925,18.725 188.375,14.175 184.85,14.175 183.382,12.707 183.382,11.897 182.303,11.897 182.025,12.175 182.025,14.375 183.75,16.1 186.925,16.1 190.42,19.595 190.42,20.92
P3V3_MP on L1 "P3V3_MP_L01_P168" (solid, remove dead copper, pour order 168): 160.275,9.497 160.275,9.098 159.39,9.098 159.39,8.269 159.556,8.075 161.6,8.075 162.5,8.975 162.5,9.8 162.35,9.95 160.728,9.95
NetC52_1 on L1 "Top Overlay-No Net" (solid, remove dead copper, pour order 149): 156.225,64.3 154.2,62.275 151.8,62.275 151.8,64.463 151.8,71.68 161.2,71.68 161.2,64.3
no net on L4 "Balancing_L4" (solid, pour order 197): -6,5.45 -6,83.45 -3.5,85.1 -3.5,94.45 214.9,94.45 216.9,92.45 216.9,-3.55 214.9,-5.55 -3.5,-5.55 -3.5,3.8
P3V3 on L4 "P3V3_L04_P195" (solid, remove dead copper, pour order 195): 16.1,3.05 19.15,3.05 19.6,2.6 19.6,0.675 20.275,0 31.975,0 34.725,0 36.45,-1.725 86.95,-1.725 93.775,5.1 101.6,5.1 106.3,0.4 124.475,0.4 126,0.4 126.65,-0.25 126.65,-2.735 108.035,-2.735 101.025,4.275 94.225,4.275 87.05,-2.9 18.3,-2.9 16.1,-0.7
P3V3 on L4 "P3V3_L04_P184" (solid, remove dead copper, pour order 184): 151.735,50.9 150.552,50.9 150.552,50.225 153.02,50.225 153.55,50.755 153.55,51.9 153.375,52.075 152.91,52.075
P3V3A on L4 "P3V3A_L04_P170" (solid, remove dead copper, pour order 170): 134.875,38.425 135.5,37.8 136.85,37.8 137.1,38.05 137.1,39.825 136.775,40.15 123.9,40.15 123.396,39.646 123.396,38.804 123.775,38.425
P3V3 on L4 "P3V3_L04_P183" (solid, remove dead copper, pour order 183): 142.925,50.9 152,50.9 152,50.225 144.25,50.225 142.925,48.9 134.292,48.9 133.234,47.843 127.996,47.843 124.489,51.35 112.962,51.35 107.15,57.162 107.15,60.95 108.275,62.075 108.275,78.632 106.562,80.345 106.562,80.831 106.606,80.875 107.333,80.875 109.544,78.664 109.544,56.556 113.55,52.55 125.104,52.55 128.104,49.55 141.575,49.55
P3V3 on L4 "P3V3_L04_P196" (solid, remove dead copper, pour order 196): 42.847,84.983 42.847,88.172 44.625,89.95 50.15,89.95 51.65,88.45 51.65,57.081 47.994,53.425 46.775,53.425 46.775,53.45 46.05,54.175 46.05,54.984 49.25,58.184 49.25,87.675 48.575,88.35 46.225,88.35 45.8,87.925 45.8,84.983
P3V3 on L4 "P3V3_L04_P194" (solid, remove dead copper, pour order 194): 48.15,43.852 48.169,43.852 48.169,53.6 46.418,55.351 43.123,55.351 43.123,54.85 44.286,54.85 44.941,54.195 44.941,53.665 42.866,51.59 42.866,44.984 43.08,44.77 44.347,44.77 44.922,44.195 44.922,43.665 42.847,41.59 42.847,34.984 43.061,34.77 44.348,34.77 44.922,34.196 44.922,33.665 42.847,31.59 42.847,24.984 43.061,24.77 44.348,24.77 44.922,24.195 44.922,23.665 42.847,21.59 42.847,14.984 43.061,14.77 44.421,14.77 45.042,14.149 45.042,10.076 43.016,8.05 20.497,8.05 20.497,4.315 44.665,4.315 48.15,7.8 48.15,15.325
P3V3 on L4 "P3V3_L04_P193" (solid, remove dead copper, pour order 193): 44.433,64.77 45.8,66.136 45.8,85.675 42.847,85.675 42.847,85.036 43.047,84.836 44.282,84.836 44.922,84.195 44.922,83.665 42.847,81.59 42.847,74.984 43.061,74.77 44.36,74.77 44.935,74.195 44.935,73.665 42.859,71.59 42.859,64.984 43.074,64.77
P3V3 on L4 "P3V3_L04_P191" (solid, remove dead copper, pour order 191): 0.054,66.669 -0.298,67.021 -1.926,65.393 -1.926,57.217 -1.359,56.649 5.422,56.649 6.039,56.032 6.039,49.047 4.087,47.095 -0.122,47.095 -0.122,46.598 0.3,46.176 0.3,43.39 0.105,43.194 -0.122,43.194 -0.122,42.695 0.101,42.695 0.316,42.481 0.316,39.826 -1.23,38.28 -2.256,38.28 -3.056,37.48 -3.056,28.783 0.225,25.502 0.225,23.802 -3.938,19.639 -3.938,19.403 -3.802,19.267 2.933,19.267 10.9,11.3 10.9,8.394 13.266,6.029 15.151,6.029 16.864,4.315 21.753,4.315 21.905,4.467 21.905,6.642 20.497,8.05 14.883,8.05 12.425,10.508 12.425,12.271 4.457,20.239 4.457,26.018 2.45,28.025 -1.15,28.025 -2.15,29.025 -2.15,36.208 -1.719,36.639 -0.561,36.639 2.27,39.47 2.27,43.283 7.02,48.033 7.02,58.276 5.196,60.1 2.5,60.1 1.642,60.958 1.642,62.366 0.814,63.195 -0.122,63.195 -0.122,62.697 0.081,62.697 0.746,62.033 0.746,59.963 0.208,59.425 -0.389,59.425 -1.34,60.376 -1.34,65.275 0.038,66.653
P12V0A on L4 "P12V0A_L04_P181" (solid, remove dead copper, pour order 181): 94.148,82.442 98.313,82.442 98.996,83.125 99.275,83.125 99.275,81 93.975,81 92.789,81 90.651,78.862 88.268,81.245 88.268,86.25 90.34,86.25
P12V0A on L4 "P12V0A_L04_P180" (solid, remove dead copper, pour order 180): 107.675,81 99.1,81 99.1,83.125 109.475,83.125 112.575,80.025 112.575,57.875 114.7,55.75 114.7,53.325 114.375,53 113.6,53 109.794,56.806 109.794,78.881
P3V3 on L4 "P3V3_L04_P174" (solid, remove dead copper, pour order 174): 135.3,11.575 137.998,11.575 137.998,9.375 136.625,9.375 135.775,8.525 135.775,5.45 134.65,4.325 130.986,4.325 130.205,3.544 130.205,3.103 131.837,1.471 131.837,-0.096 131.68,-0.253 130.578,-0.253 123.425,6.9 111.05,6.9 109.946,8.004 108.742,8.004 108.589,8.157 108.589,8.362 108.752,8.525 125.625,8.525 126.175,7.975 133.55,7.975 133.7,8.125 133.7,9.975
N12V0A on L4 "ML1_BAL" (solid, remove dead copper, pour order 148): 67.35,83.286 67.35,5.474 71.424,1.4 87.475,1.4 87.475,4.88 77.744,4.88 71.37,4.88 70.444,5.806 70.444,14.13 70.444,84.38 70.194,84.63 68.694,84.63
P12V0A on L4 "ML1_BAL" (solid, remove dead copper, pour order 150): 72.444,5.13 71.444,5.13 70.944,5.63 70.694,5.88 70.694,7.206 70.694,84.88 71.444,85.63 74.664,88.85 87.742,88.85 91.194,85.398 91.194,84.63 91.194,11.13 90.694,10.63 90.194,10.63 89.803,10.63 87.694,12.739 87.694,83.281 86.595,84.38 80.194,84.38 78.694,84.38 78.194,83.88 77.922,83.608 74.444,83.608 74.422,83.608 73.944,83.13 73.944,6.63 72.444,5.13 71.694,5.13
N12V0A on L4 "ML1_BAL" (solid, remove dead copper, pour order 151): 92.944,77.38 93.309,77.38 94.444,76.245 94.444,7.869 87.975,1.4 85.8,1.4 85.8,4.601 91.769,10.57 91.769,77.205 91.944,77.38
N12V0A on L4 "N12V0A_L04_P182" (solid, remove dead copper, pour order 182): 93.095,14.465 94.34,7.798 95.204,8.662 103.123,8.662 106.457,11.995 108.145,11.995 112.95,16.8 112.95,17.981 112.306,18.625 111.5,18.625 106.675,13.8 103.35,13.8 100.812,11.262 100.247,11.262 99.026,12.483 95.076,12.483
P3V3 on L4 "P3V3_L04_P173" (solid, remove dead copper, pour order 173): 147.325,11.575 136.625,11.575 136.625,9.375 148.525,9.375 163.68,24.53 180.356,24.53 180.942,25.117 180.942,31.339 184.25,34.647 184.25,44.07 180.695,47.625 180.4,47.625 180.25,47.475 180.25,45.475 182.65,43.075 182.65,39.367 179.975,36.692 179.975,34.05 178.832,32.907 165.043,32.907 163.95,34 161.725,34 160.6,32.875 160.6,24.85
P12V0 on L4 "P12V0_L04_P159" (solid, remove dead copper, pour order 159): 216.9,0.321 216.9,-2.759 192.618,-2.759 192.6,-2.777 192.6,7.233 182.434,17.399 171.927,17.399 170.998,18.328 170.998,23.071 172.148,24.221 191.972,24.221 193.318,22.874 193.318,14.757 194.588,13.487 194.588,3.837 198.104,0.321 200.771,0.321 209.521,0.321
STRIP2 on L4 "STRIP2_L04_P155" (solid, pour order 155): 96.5,-5.55 96.5,-3.15 41.5,-3.15 41.5,-5.55
STRIP3 on L4 "STRIP3_L04_P154" (solid, pour order 154): 214.145,-5.55 216.545,-3.15 116.5,-3.15 116.5,-5.55
CHASSIS on L4 "CHASSIS_L04_P153" (solid, pour order 153): 3,1.7 ccw(c1,1.7) 1,3.7 -3.5,3.7 -3.5,-5.55 36.5,-5.55 36.5,-3.15 3,-3.15
P2V5A on L4 "P2V5A_L04_P185" (solid, remove dead copper, pour order 185): 124.55,35.825 124.55,37.275 141.475,37.275 148.25,44.05 152.354,44.05 152.402,44.002 151.876,43.476 148.84,43.476 141.189,35.825
P3V3_MP on L4 "P3V3_MP_L04_P179" (solid, remove dead copper, pour order 179): 160.599,8.551 160.599,9.624 163.4,12.425 164.075,12.425 164.325,12.175 164.325,8.975 167.35,5.95 174.275,5.95 175.281,6.956 175.281,8.368 175.781,8.368 175.781,6.969 176.825,5.925 177.925,5.925 182.075,10.075 182.075,13.75 182.65,14.325 183.875,14.325 184.25,13.95 184.25,7.6 180.45,3.8 165.35,3.8
P12V0 on L4 "P12V0_L04_P175" (solid, remove dead copper, pour order 175): 175.175,24.221 163.971,24.221 148.725,8.975 136.198,8.975 135.525,8.302 135.525,7.375 149.375,7.375 159.399,17.399 175.175,17.399
P3V3 on L4 "P3V3_L04_P172" (solid, remove dead copper, pour order 172): 126.65,-2.735 126.65,-0.25 126,0.4 125.25,0.4 122.585,-2.265 122.585,-2.735
GND on L4 "GND_L04_P160" (solid, remove dead copper, pour order 160): 202.9,46.2 202.9,42.7 216.469,42.7 216.469,46.2
no net on L3 "Balancing_L3" (solid, pour order 190): -6,5.45 -6,83.45 -3.5,85.1 -3.5,94.45 214.9,94.45 216.9,92.45 216.9,-3.55 214.9,-5.55 -3.5,-5.55 -3.5,3.8
GND on L3 "L3-GND" (solid, remove dead copper, pour order 152): -6.042,94.45 216.122,94.45 216.122,-2.994 100.369,-2.994 100.369,-3.025 -5.671,-3.025
GND on P2 (split plane): 216.39,92.239 216.39,-3.339 214.689,-5.04 -2.99,-5.04 -2.99,3.8 -2.99,3.801 -2.99,3.803 -2.995,3.851 -2.999,3.9 -3,3.901 -3,3.902 -3.014,3.949 -3.028,3.995 -3.029,3.997 -3.03,3.998 -3.053,4.041 -3.076,4.084 -3.076,4.085 -3.077,4.086 -3.108,4.123 -3.139,4.161 -3.14,4.162 -3.141,4.163 -3.179,4.193 -3.216,4.224 -3.218,4.225 -3.219,4.226 -5.49,5.725 -5.49,83.175 -3.219,84.674 -3.218,84.675 -3.216,84.676 -3.179,84.707 -3.141,84.737 -3.14,84.738 -3.139,84.739 -3.108,84.777 -3.077,84.814 -3.076,84.815 -3.076,84.816 -3.053,84.859 -3.03,84.902 -3.029,84.903 -3.028,84.905 -3.014,84.951 -3,84.998 -3,84.999 -2.999,85 -2.995,85.049 -2.99,85.097 -2.99,85.099 -2.99,85.1 -2.99,93.94 118.803,93.94 118.803,62.703 128.985,52.521 151.336,52.521 162.405,63.589 162.405,66.15 161.205,66.15 161.205,63.639 151.286,53.721 129.535,53.721 120.003,63.253 120.003,93.94 214.689,93.94

## Keep-outs
L1:
  region: 214.9,-5.55 -3.5,-5.55 -3.5,-3.05 216.9,-3.05 216.9,-3.55
  region: 214.9,94.45 -3.5,94.45 -3.5,91.95 216.9,91.95 216.9,92.45
  lines w0.1: 165.603,47.274 167.625,47.275 ; 165.603,54.774 169.364,54.774 ; 193.35,20.825 193.35,18.625 191.325,16.6 191.325,12.25 193.875,9.7 ; 196.334,9.478 196.334,21.294 196.989,21.949 196.989,37.225 ; 201.525,29.7 201.525,28.4 205.025,24.9 205.025,11.875 203.725,10.575
L3:
  circle w0.254: c8.791,1 r2.607
  circle w0.254: c27.3,1 r2.607
  circle w0.254: c27.3,88 r2.607
  circle w0.254: c8.3,88 r2.607
L4:
  circle w0.254: c27.3,1 r2.607
  region: 214.9,-5.55 -3.5,-5.55 -3.5,-3.05 216.9,-3.05 216.9,-3.55
  region: 214.9,94.45 -3.5,94.45 -3.5,91.95 216.9,91.95 216.9,92.45
  region: 6.7,-3.5 -3.3,-3.5 -3.3,3.5 6.7,3.5
  region: 6.7,85.4 -3.3,85.4 -3.3,92.4 6.7,92.4
  lines w0.1: 124.875,40.497 136.934,40.497 137.413,40.018 137.413,38.389 138.052,37.75 141.175,37.75 144.275,40.85 ; 194.675,36.825 197.625,36.825 200.4,34.05
KeepOutLayer:
  circle w0.25: c0,200 r1.414
  circle w0.25: c0,288.9 r1.414
  lines w0.254: -6,194.45 94,294.45 194,194.45 218,218.45 142,294.45 42,194.45 ; 218,194.45 118,294.45 18,194.45 ; 218,294.45 118,194.45 18,294.45 -6,270.45 ; -6,196.45 -4,194.45 ; -6,196.45 -4,194.45 ; -6,196.45 92,294.45 192,194.45 218,220.45 144,294.45 44,194.45 ; -6,198.45 -2,194.45 ; -6,198.45 -2,194.45 ; -6,198.45 90,294.45 190,194.45 218,222.45 146,294.45 46,194.45 ; -6,200.45 0,194.45 ; -6,200.45 0,194.45 ; -6,200.45 88,294.45 188,194.45 218,224.45 148,294.45 48,194.45 ; -6,202.45 2,194.45 ; -6,202.45 2,194.45 ; -6,202.45 86,294.45 186,194.45 218,226.45 150,294.45 50,194.45 ; -6,204.45 4,194.45 ; -6,204.45 4,194.45 ; -6,204.45 84,294.45 184,194.45 218,228.45 152,294.45 52,194.45 ; -6,206.45 6,194.45 ; -6,206.45 6,194.45 ; -6,206.45 82,294.45 182,194.45 218,230.45 154,294.45 54,194.45 ; -6,208.45 8,194.45 ; -6,208.45 8,194.45 ; -6,208.45 80,294.45 180,194.45 218,232.45 156,294.45 56,194.45 ; -6,210.45 10,194.45 ; -6,210.45 10,194.45 ; -6,210.45 78,294.45 178,194.45 218,234.45 158,294.45 58,194.45 ; -6,212.45 12,194.45 ; -6,212.45 12,194.45 ; -6,212.45 76,294.45 176,194.45 218,236.45 160,294.45 60,194.45 ; -6,214.45 14,194.45 ; -6,214.45 14,194.45 ; -6,214.45 74,294.45 174,194.45 218,238.45 162,294.45 62,194.45 ; -6,216.45 16,194.45 ; -6,216.45 16,194.45 ; -6,216.45 72,294.45 172,194.45 218,240.45 164,294.45 64,194.45 ; -6,218.45 18,194.45 ; -6,218.45 18,194.45 ; -6,218.45 70,294.45 170,194.45 218,242.45 166,294.45 66,194.45 ; -6,220.45 20,194.45 ; -6,220.45 20,194.45 ; -6,220.45 68,294.45 168,194.45 218,244.45 168,294.45 68,194.45 ; -6,222.45 22,194.45 ; -6,222.45 22,194.45 ; -6,222.45 66,294.45 166,194.45 218,246.45 170,294.45 70,194.45 ; -6,224.45 24,194.45 ; -6,224.45 24,194.45 ; -6,224.45 64,294.45 164,194.45 218,248.45 172,294.45 72,194.45 ; -6,226.45 26,194.45 ; -6,226.45 26,194.45 ; -6,226.45 62,294.45 162,194.45 218,250.45 174,294.45 74,194.45 ; -6,228.45 28,194.45 ; -6,228.45 28,194.45 ; -6,228.45 60,294.45 160,194.45 218,252.45 176,294.45 76,194.45 ; -6,230.45 30,194.45 ; -6,230.45 30,194.45 ; -6,230.45 58,294.45 158,194.45 218,254.45 178,294.45 78,194.45 ; -6,232.45 32,194.45 ; -6,232.45 32,194.45 ; -6,232.45 56,294.45 156,194.45 218,256.45 180,294.45 80,194.45 ; -6,234.45 34,194.45 ; -6,234.45 34,194.45 ; -6,234.45 54,294.45 154,194.45 218,258.45 182,294.45 82,194.45 ; -6,236.45 36,194.45 ; -6,236.45 36,194.45 ; -6,236.45 52,294.45 152,194.45 218,260.45 184,294.45 84,194.45 ; -6,238.45 38,194.45 ; -6,238.45 38,194.45 ; -6,238.45 50,294.45 150,194.45 218,262.45 186,294.45 86,194.45 ; -6,240.45 40,194.45 ; -6,240.45 40,194.45 ; -6,240.45 48,294.45 148,194.45 218,264.45 188,294.45 88,194.45 ; -6,242.45 42,194.45 ; -6,242.45 42,194.45 ; -6,242.45 46,294.45 146,194.45 218,266.45 190,294.45 90,194.45 ; -6,244.45 44,194.45 ; -6,244.45 44,194.45 ; -6,244.45 44,294.45 144,194.45 218,268.45 192,294.45 92,194.45 ; -6,246.45 46,194.45 ; -6,246.45 46,194.45 ; -6,246.45 42,294.45 142,194.45 218,270.45 194,294.45 94,194.45 ; -6,248.45 48,194.45 ; -6,248.45 48,194.45 ; -6,248.45 40,294.45 140,194.45 218,272.45 196,294.45 96,194.45 -4,294.45 -6,292.45 ; -6,250.45 50,194.45 ; -6,250.45 50,194.45 ; -6,250.45 38,294.45 138,194.45 218,274.45 198,294.45 98,194.45 -2,294.45 -6,290.45 ; -6,252.45 52,194.45 ; -6,252.45 52,194.45 ; -6,252.45 36,294.45 136,194.45 218,276.45 200,294.45 100,194.45 0,294.45 -6,288.45 ; -6,254.45 54,194.45 ; -6,254.45 54,194.45 ; -6,254.45 34,294.45 134,194.45 218,278.45 202,294.45 102,194.45 2,294.45 -6,286.45 ; -6,256.45 56,194.45 ; -6,256.45 56,194.45 ; -6,256.45 32,294.45 132,194.45 218,280.45 204,294.45 104,194.45 4,294.45 -6,284.45 ; -6,258.45 58,194.45 ; -6,258.45 58,194.45 ; -6,258.45 30,294.45 130,194.45 218,282.45 206,294.45 106,194.45 6,294.45 -6,282.45 ; -6,260.45 60,194.45 ; -6,260.45 60,194.45 ; -6,260.45 28,294.45 128,194.45 218,284.45 208,294.45 108,194.45 8,294.45 -6,280.45 ; -6,262.45 62,194.45 ; -6,262.45 62,194.45 ; -6,262.45 26,294.45 126,194.45 218,286.45 210,294.45 110,194.45 10,294.45 -6,278.45 ; -6,264.45 64,194.45 ; -6,264.45 64,194.45 ; -6,264.45 24,294.45 124,194.45 218,288.45 212,294.45 112,194.45 12,294.45 -6,276.45 ; -6,266.45 66,194.45 ; -6,266.45 66,194.45 ; -6,266.45 22,294.45 122,194.45 218,290.45 214,294.45 114,194.45 14,294.45 -6,274.45 ; -6,268.45 68,194.45 ; -6,268.45 68,194.45 ; -6,268.45 20,294.45 120,194.45 218,292.45 216,294.45 116,194.45 16,294.45 -6,272.45 ; -6,270.45 70,194.45 ; -6,270.45 70,194.45 ; -6,272.45 72,194.45 ; -6,272.45 72,194.45 ; -6,274.45 74,194.45 ; -6,274.45 74,194.45 ; -6,276.45 76,194.45 ; -6,276.45 76,194.45 ; -6,278.45 78,194.45 ; -6,278.45 78,194.45 ; -6,280.45 80,194.45 ; -6,280.45 80,194.45 ; -6,282.45 82,194.45 ; -6,282.45 82,194.45 ; -6,284.45 84,194.45 ; -6,284.45 84,194.45 ; -6,286.45 86,194.45 ; -6,286.45 86,194.45 ; -6,288.45 88,194.45 ; -6,288.45 88,194.45 ; -6,290.45 90,194.45 ; -6,290.45 90,194.45 ; -6,292.45 92,194.45 ; -6,292.45 92,194.45 ; -4,194.45 96,294.45 196,194.45 218,216.45 140,294.45 40,194.45 ; -2,194.45 98,294.45 198,194.45 218,214.45 138,294.45 38,194.45 ; 0,194.45 100,294.45 200,194.45 218,212.45 136,294.45 36,194.45 ; 2,194.45 102,294.45 202,194.45 218,210.45 134,294.45 34,194.45 ; 4,194.45 104,294.45 204,194.45 218,208.45 132,294.45 32,194.45 ; 6,194.45 106,294.45 206,194.45 218,206.45 130,294.45 30,194.45 ; 8,194.45 108,294.45 208,194.45 218,204.45 128,294.45 28,194.45 ; 10,194.45 110,294.45 210,194.45 218,202.45 126,294.45 26,194.45 ; 12,194.45 112,294.45 212,194.45 218,200.45 124,294.45 24,194.45 ; 14,194.45 114,294.45 214,194.45 218,198.45 122,294.45 22,194.45 ; 16,194.45 116,294.45 216,194.45 218,196.45 120,294.45 20,194.45 ; 94,194.45 -6,294.45 94,194.45

## Other copper
L1:
  region net IN_P0: 52.875,80.9 52.875,84.775 49.052,84.775 49.052,80.9
  rectangle net IN_P0: 49.052,82.72 55.269,84.775
  region net IN_P1: 52.875,70.9 52.875,74.775 49.052,74.775 49.052,70.9
  rectangle net IN_P1: 49.052,72.72 55.269,74.775
  region net IN_P7: 52.875,10.9 52.875,14.775 49.052,14.775 49.052,10.9
  rectangle net IN_P7: 49.052,12.72 55.269,14.775
  region net IN_P4: 52.875,40.9 52.875,44.775 49.052,44.775 49.052,40.9
  rectangle net IN_P4: 49.052,42.72 55.269,44.775
  rectangle net IN_P5: 49.052,32.72 55.269,34.775
  region net IN_P5: 52.875,30.9 52.875,34.775 49.052,34.775 49.052,30.9
  rectangle net IN_P2: 49.064,62.72 55.282,64.775
  region net IN_P2: 52.888,60.9 52.888,64.775 49.064,64.775 49.064,60.9
  rectangle net IN_P3: 49.052,52.72 55.269,54.775
  region net IN_P3: 52.875,50.9 52.875,54.775 49.052,54.775 49.052,50.9
  rectangle net IN_P6: 49.052,22.72 55.269,24.775
  region net IN_P6: 52.875,20.9 52.875,24.775 49.052,24.775 49.052,20.9
  rectangle net GND: 103.994,45.53 104.419,45.921
  rectangle net P5V0A: 108.769,29.78 109.519,31.155
  rectangle net GND: 202.9,42.7 216.469,46.203
  rectangle net NetC52_1: 140.191,63.97 140.475,64.486
  rectangle net GND: 143.916,58.068 144.366,58.558
  rectangle net P6V0: 135.141,58.87 135.277,59.163
  rectangle net P6V0: 135.166,59.87 135.316,60.17
  pour cut-out: 151.332,52.532 162.4,63.6 162.4,94.453 161.2,94.453 161.2,63.65 151.282,53.732 139.55,53.732 139.55,52.532
  pour cut-out: 96.5,-3.156 96.5,-5.142 116.5,-5.142 116.5,-3.156
  pour cut-out: 36.5,-3.156 36.5,-5.142 41.5,-5.142 41.5,-3.156
  pour cut-out: 146.571,52.532 146.571,53.732 129.524,53.732 120.003,63.253 120.003,94.45 118.803,94.45 118.803,62.703 128.974,52.532